# Altium PCB ePBR25_ACU_Power_rev0.PcbDoc (part 2 of 5)
Units mil, origin at the board's own origin, x right, y up, seen from the top; angles counter-clockwise.
Board outline 8211 x 3959 mil, 2 copper layers (Top Layer, Bottom Layer); 145 components, 129 nets, 544 pads, 1610 vias.
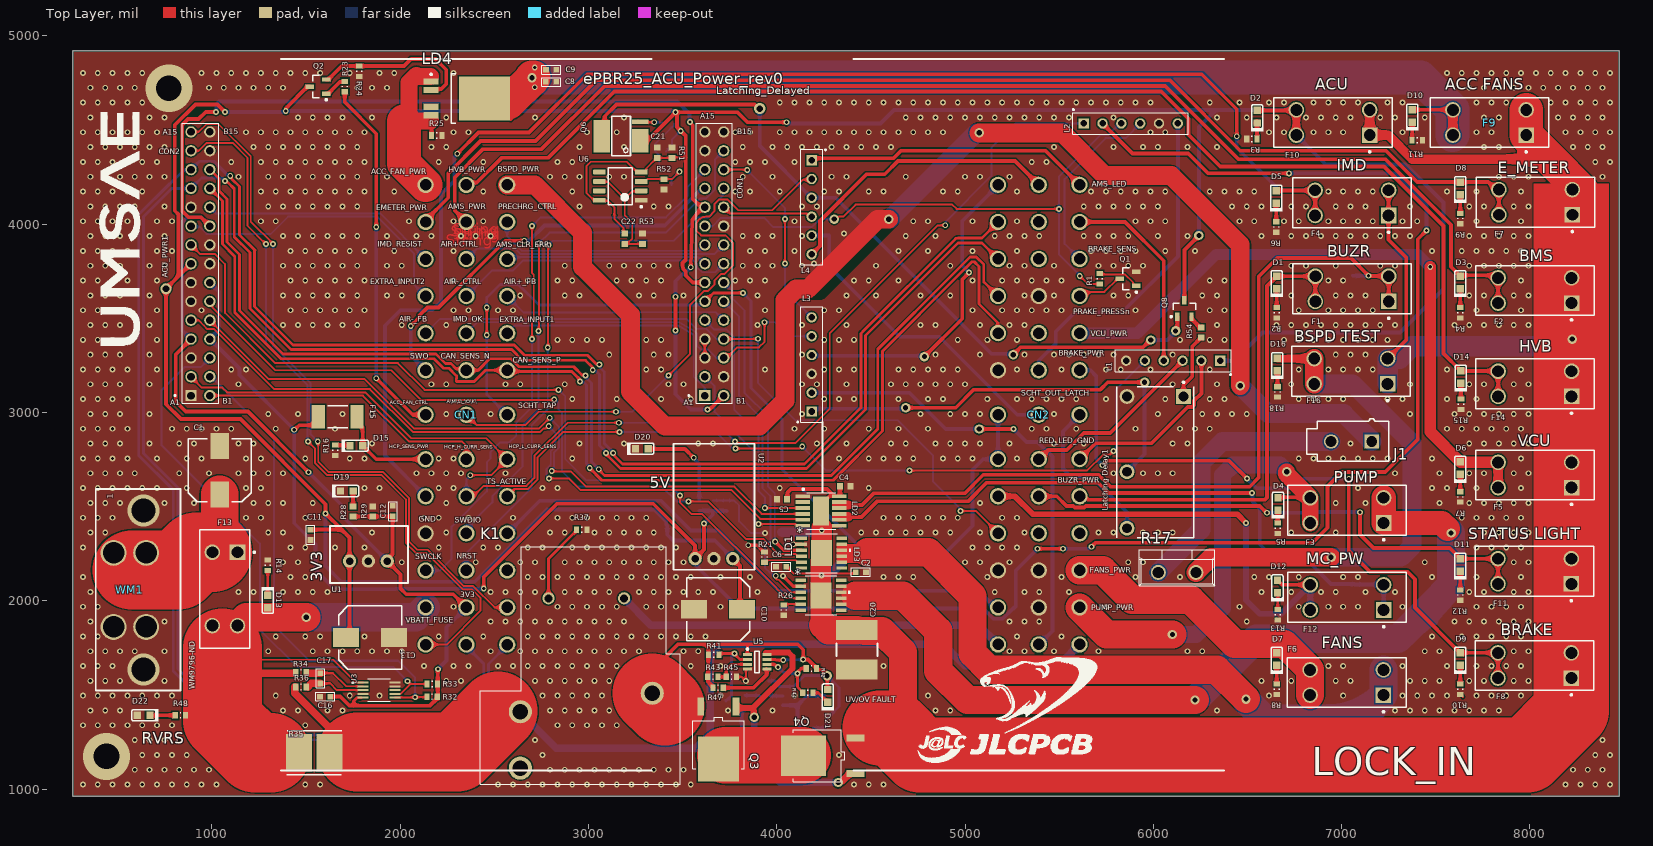
[diagram p0: Top Layer view]

## Via types
v1: diameter 31, hole 17, Top Layer to Bottom Layer, 1578 vias
v2: diameter 50, hole 28, Top Layer to Bottom Layer, 24 vias
v3: diameter 30, hole 15, Top Layer to Bottom Layer, 3 vias
v4: diameter 170, hole 128, Top Layer to Bottom Layer, 2 vias
v5: diameter 250, hole 137, Top Layer to Bottom Layer, 2 vias
v6: diameter 60, hole 34, Top Layer to Bottom Layer, 1 vias

## Nets (pads, with @x,y where several pads share a name; then routed paths per layer and width w, separated by ;. In a path a pad name is that pad's centre, name@x,y a point inside that pad or via, vN(x,y) a via of type N, cw(c..) or ccw(c..) an arc to the next point about the centre after c; other vN are vias at no path point) (continued)
3V3: (continued)
  Bottom Layer w20: CON2.A4@889,3390 841.88,3437.12 841.88,4009.52 869.48,4037.12 941.88,4037.12 CON2.B10@989,3990 ; v1(1022,4596) 1024.1,4598.1 1024.1,4637.1 1038,4651 3471,4651 3536.44,4585.56 3536.44,4544.91 v1(3538.54,4542.81) ; v1(1513.2,2682.75) 1686.38,2509.57 1686.38,2455.62 U1.3@1931,2211 ; v3(2201,1637) 2246.53,1682.53 2246.53,1859.37 CN1.35@2351.54,1964.38 ; v1(3462.4,3435) 3462.4,3096.6 3542.64,3016.36 v1(3632.58,3016.36) ; v1(3462.4,3615) 3462.4,3697.29 3500.47,3735.37 3507.64,3735.37 v1(3543.3,3771.03)
3V3_ON: D19.1 R28.2 | length 81.8
  Top Layer w20: R28.2@1749,2501.56 1749.46,2502.02 1749.46,2582.53 D19.1@1749.93,2583
5V: C15.2 CON2.B4 CON2.B7 F15.1 L2.2 R30.1 R31.2 U2.3 | length 12617.4
  Top Layer w20: v1(1436.8,2908.27) 1439.78,2908.27 1464.2,2932.69 1539.41,2932.69 1564.45,2957.73 F15.1@1564.45,2977.95 ; v1(2443.59,2064.46) 2443.59,2126.59 2832.5,2515.5 3344,2515.5 3566,2293.5 U2.3@3566,2224 3613.97,2271.97 v1(3613.97,2411.13) ; v1(5385.22,2275.99) v1(5519.38,2276) ; v1(5671.24,2287) 5692.89,2308.64 6844.66,2308.64 6924.09,2388.08 6924.09,2607.09 7000.5,2683.5 7231.5,2683.5 7404.4,2856.4 7404.4,3919.7 v1(7451,3966.3) ; L2.2@5730,4535 5889,4376 6185,4376 6291,4270 v1(6720,4270)
  Bottom Layer w20: CON2.B7@989,3690 1036.12,3642.88 1036.12,3437.12 CON2.B4@989,3390 1146.19,3232.81 1146.19,3198.88 v1(1436.8,2908.27) 1436.8,2411.38 1550,2298.19 1550,2164.2 1653.85,2060.35 1654.34,2059.86 1654.41,2059.82 1670.95,2059.82 1975.72,2062 1978.18,2064.46 v1(2443.59,2064.46) ; U2.3@3549.56,2207.56 3798.62,1958.5 5095.89,1958.5 5149.95,1904.45 5199.91,1904.45 5253.96,1958.5 5256.78,1958.5 5268.49,1970.22 5268.49,2159.26 v1(5385.22,2275.99) ; R30.1@3589,2478.44 3589.72,2477.72 3733.28,2477.72 C15.2@3734,2477 ; v1(3613.97,2411.13) 3660,2457.16 R31.2@3660,2465 ; v1(5519.38,2276) 5657.26,2276 5668.26,2287 v1(5671.24,2287) ; v1(6720,4270) 7287.09,4270 7451,4106.09 v1(7451,3966.3)
5V_ON: D20.1 R30.2 | length 499.6
  Top Layer w20: D20.1@3317.16,2806.77 3511.67,2806.77 v1(3558.9,2759.54)
  Bottom Layer w20: v1(3558.9,2759.54) 3558.9,2756.57 3588.55,2726.91 R30.2@3588.55,2533.56
555_OUT: R38.1 U4.3 | length 71.5
  Bottom Layer w10: R38.1@3962.56,1497.11 R38.1@3965.11,1494.56
  Bottom Layer w15: R38.1@3965.11,1494.56 U4.3@4032.97,1494.56
555_OUT_LATCHING: Q7.1 R52.2 U6.3 | length 313
  Top Layer w10: U6.3@3280,4227 3299.68,4227 3312.68,4240 3444,4240 v1(3483,4279)
  Bottom Layer w10: Q7.1@3440.4,4208.15 3440.4,4236.4 v1(3483,4279)
A\M\S\_\O\K\: CN1.20 L4.2 | length 3113.3
  Top Layer w10: CN1.20@2351.54,2988 2406.84,2932.69 2663.63,2932.69 2734.94,3004 v1(3146.3,3004) ; v1(3425.5,3196.75) 3538.54,3309.79 3538.54,3570.09 3613.25,3644.8 3632.38,3644.8 3669.73,3682.15 3669.73,3701.28 3704,3735.55 3723.13,3735.55 3767,3779.42 3767,3900.58 3727.58,3940 3598.1,3940 3573.05,3965.05 3573.05,3996.09 cw(c3583.05,3996.05) 3573.08,3996.77 cw(c3613.92,3993.69) 3584.97,4022.66 cw(c3627.15,3980.46) 3622.88,4039.98 cw(c3623.55,4030) 3623.55,4040 3640,4040 3668.45,4068.45 3668.45,4106.32 3694.25,4132.12 3737.88,4132.12 3796,4074 3976.46,4074 4138.31,4235.85 4180.85,4235.85 L4.2@4185,4240
  Bottom Layer w10: v1(3146.3,3004) 3232.75,3004 v1(3425.5,3196.75)
ACC_FAN_CTRL: CN1.21 R23.1 | length 1949.6
  Top Layer w10: R23.1@1706,4703.44 1709.94,4703.44 R23.1@1718.72,4694.66
  Top Layer w20: R23.1@1706,4703.44 1706,4647.3 1872.77,4480.53 v1(1872.77,3985.32) ; v1(1872.77,3181.7) 2066.47,2988 CN1.21@2135,2988
  Bottom Layer w20: v1(1872.77,3181.7) v1(1872.77,3985.32)
ACC_FAN_PWR: C8.2 C9.2 D10.1 F9.3 F9.4 LD4.3 | length 5661.8
  Top Layer w20: D10.1@7374.9,4608.24 F9.4@7588,4608.24 ; F9.4@7589.69,4608.24 F9.4@7588,4608.24 ; F9.4@7590.24,4606 F9.4@7589.38,4606.86 ; F9.4@7590.24,4606.86 F9.4@7589.38,4606.86 ; F9.4@7588,4608.24 F9.4@7589.38,4606.86
  Top Layer w50: F9.3@7590.24,4473 F9.4@7590.24,4606
  Top Layer w180: LD4.3@2578.3,4648.31 2707.99,4778 v2(2700,4778)
  Bottom Layer w1: F9.4@7588,4609.09 7588,4670.4
  Bottom Layer w180: 2736.74,4778 2760.24,4778 7419.09,4778 7588,4609.09 F9.3@7588,4473
  other v1: 2714.39,4727.18 2714.39,4831.69
ACC_FAN_PWR_IN: CN1.3 LD4.1 LD4.5 R25.1 | length 835.3
  Top Layer w10: LD4.5@2164.02,4578.24 LD4.5@2166.42,4575.84
  Top Layer w20: LD4.5@2133.67,4571.5 2140.4,4578.24 LD4.5@2164.02,4578.24 ; R25.1@2166.42,4471 LD4.5@2166.42,4575.84
  Top Layer w90: 2047.25,4612.94 2047.25,4751.53 2086.62,4790.9 ; 2102.68,4784.6 2161,4785 ; 2105,4549 2161,4549
  Top Layer w180: 2020.27,4546.3 2020.27,4323.2 CN1.3@2135,4208.47